# Altium PCB OpenRex_V1I1_PCB.PcbDoc (part 5 of 12)
Units mm, origin at the board's own origin, x right, y up, seen from the top; angles counter-clockwise.
Board outline 70 x 95 mm, 10 copper layers (L1, L2, L3, L4 (PWR), L5 (PWR), L6 (PWR), L7 (PWR), L8, L9, L10), stack 1.632 mm thick; 1080 components, 708 nets, 3831 pads, 2373 vias.
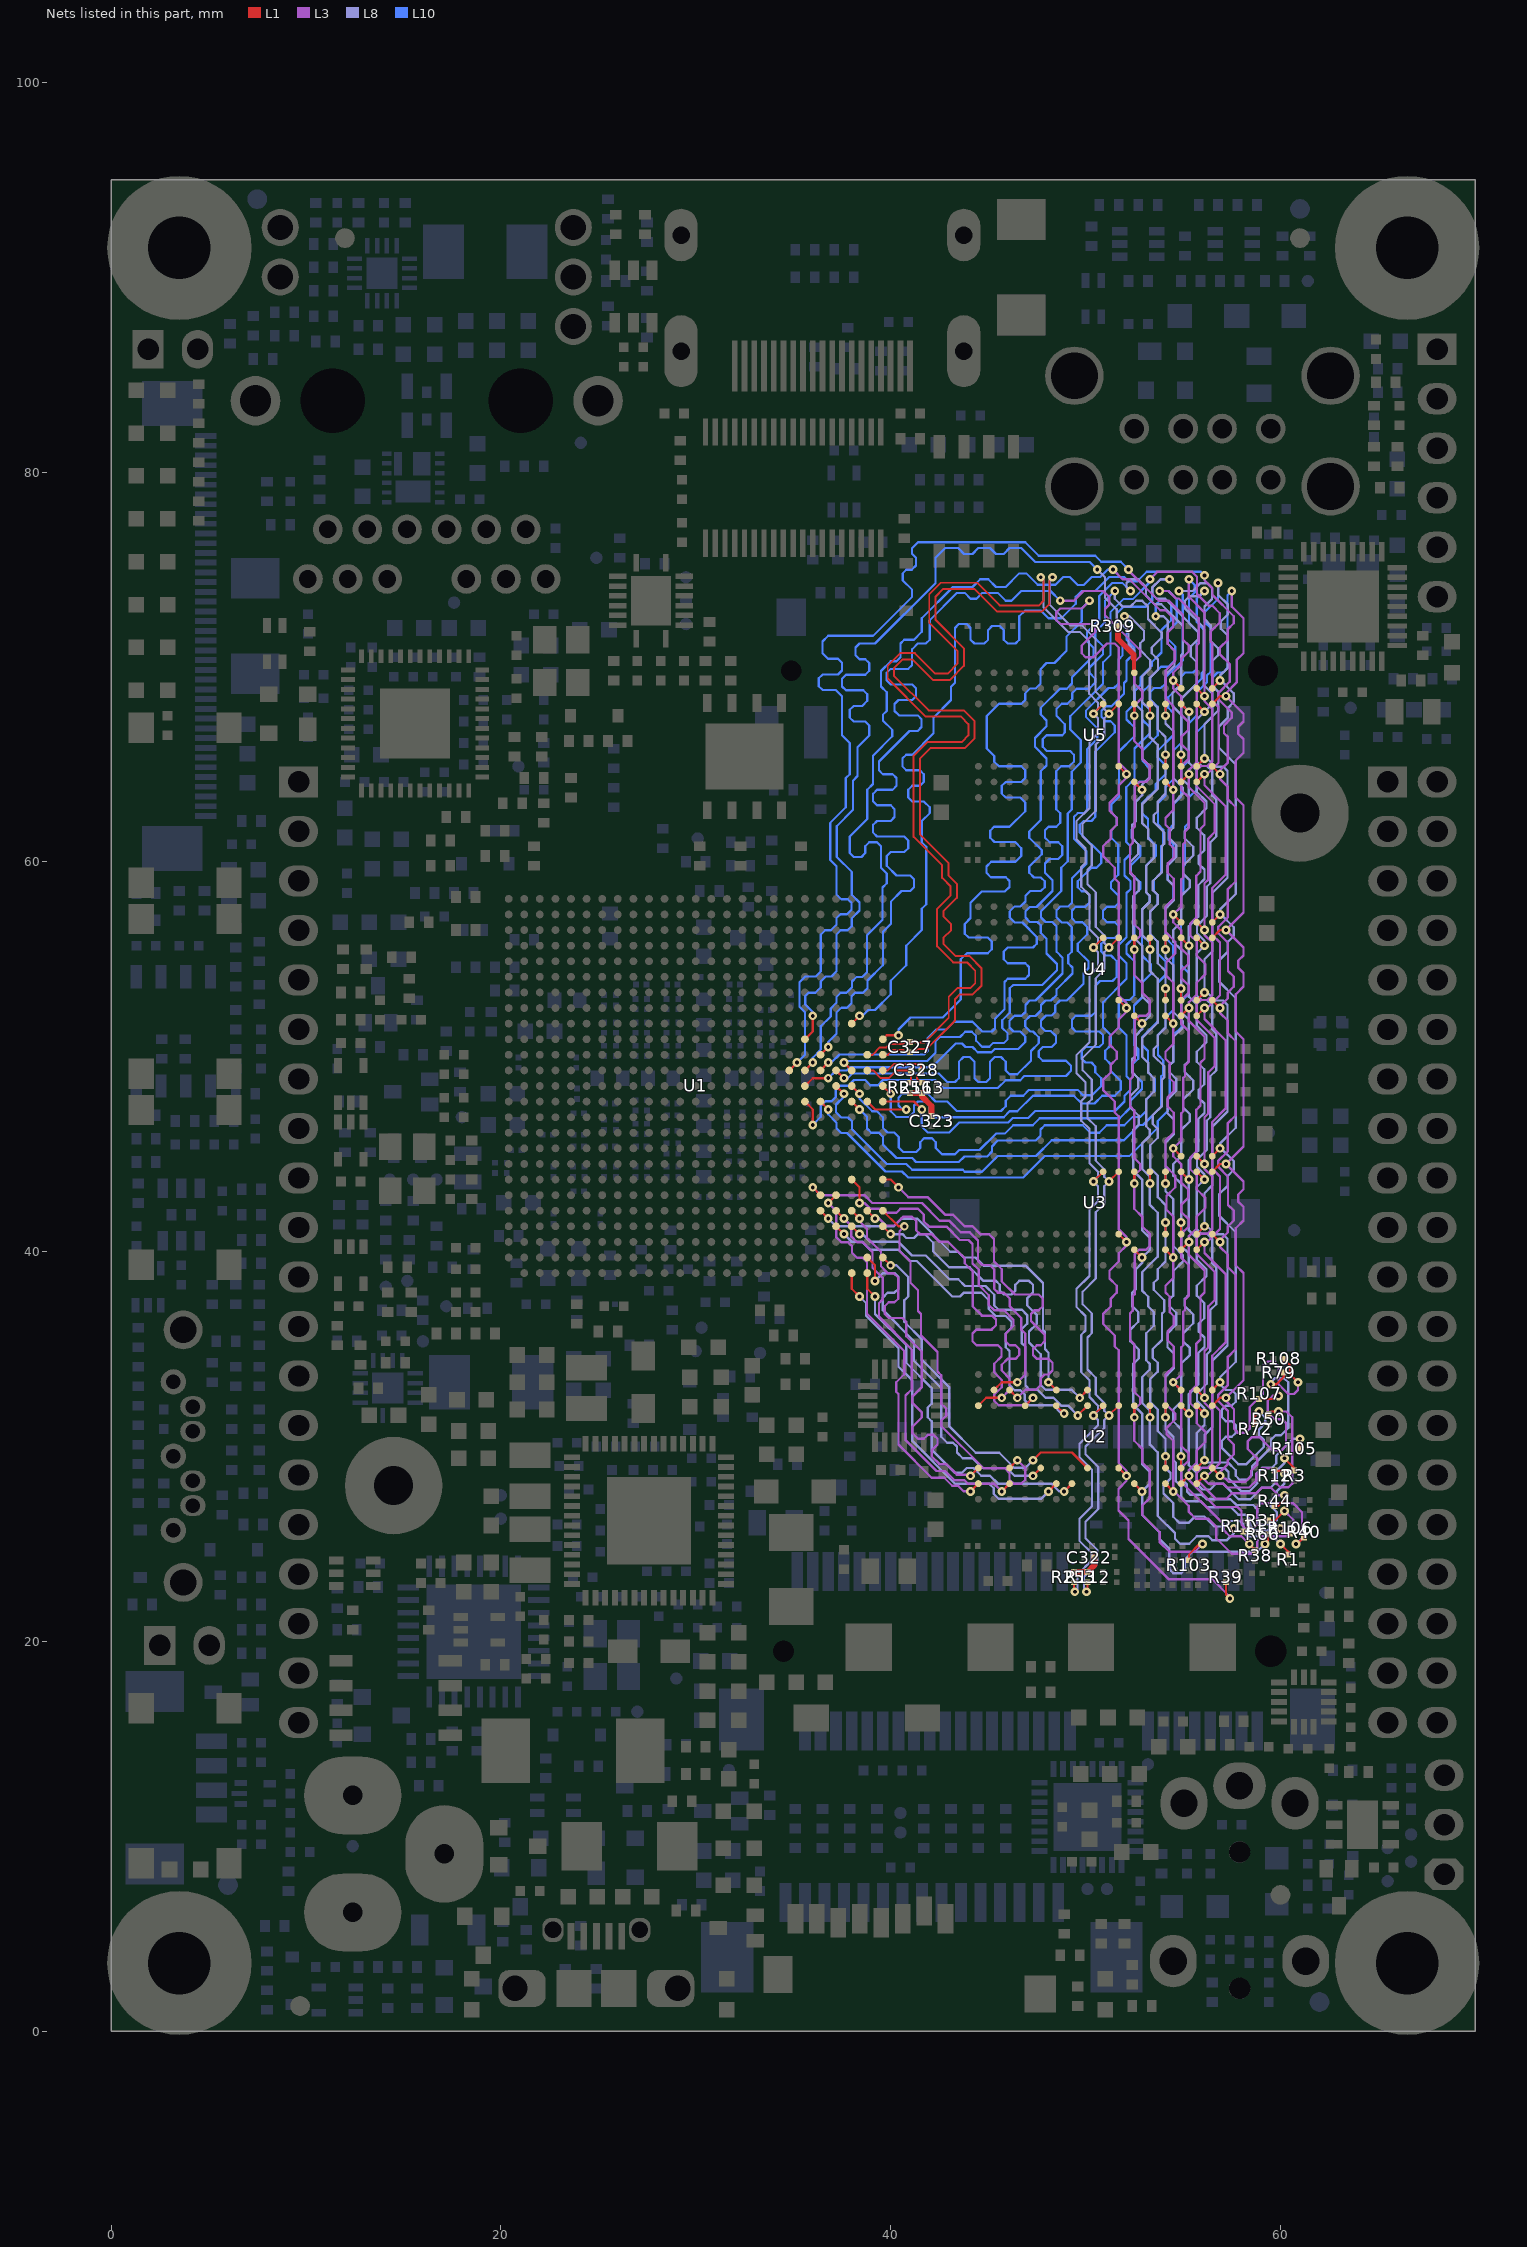
[diagram p13: the nets of this part, all layers, seen from the top]

## Via types
v1: diameter 0.45, hole 0.2, L1 to L10, tented both sides, 2369 vias
v2: diameter 1, hole 0.5, L1 to L10, tented top, 4 vias

## Nets (pads, with @x,y where several pads share a name; then routed paths per layer and width w, separated by ;. In a path a pad name is that pad's centre, name@x,y a point inside that pad or via, vN(x,y) a via of type N, cw(c..) or ccw(c..) an arc to the next point about the centre after c; other vN are vias at no path point) (continued)
DRAM3_ZQ1: R309.2 U5.L9 | length 2.7
  L1 w0.19: 52.48,70.44 52.48,69.72 U5.L9@52.5,69.7
  L1 w0.3: R309.2@51.665,72.1 51.665,71.435 52.46,70.64 52.46,70.46
DRAM_A0: R1.1 U1.AC14 U2.N3 U3.N3 U4.N3 U5.N3 | length 109.6
  L1 w0.114: v1(37.6,49.7) U1.AC14@38,49.3 ; U2.N3@54.1,28.9 v1(54.1,29.5) ; U3.N3@54.1,40.9 v1(54.1,41.5) ; U4.N3@54.1,52.9 v1(54.1,53.5) ; U5.N3@54.1,64.9 v1(54.1,65.5) ; v1(60,25) 60.4,24.6 R1.1@60.4,24.465
  L8 w0.12: v1(51.5,73.9) 51.5,73.5 51.9,73.1 52.3,73.1 52.6,73.4 52.9,73.4 53.2,73.1 53.2,72.456 53.9,71.756 53.9,71.5 53.4,71 53.4,70.7 53.715,70.385 53.715,69.859 53.3,69.444 53.3,68.3 53.7,67.9 53.7,66.8 54.1,66.4 v1(54.1,65.5) 54.1,63.5 53.7,63.1 53.7,62.6 53.5,62.4 53.5,62.044 54.035,61.509 54.035,60.935 53.92,60.82 53.92,59.476 53.45,59.006 53.45,58.55 53.7,58.3 53.7,57.844 53.315,57.459 53.315,56.29 53.7,55.905 53.7,54.8 54.1,54.4 v1(54.1,53.5) 54.1,51.5 53.7,51.1 53.7,50.6 53.5,50.4 53.5,50.044 54.035,49.509 54.035,48.935 53.92,48.82 53.92,47.476 53.45,47.006 53.45,46.55 53.7,46.3 53.7,45.844 53.315,45.459 53.315,44.29 53.7,43.905 53.7,42.8 54.1,42.4 v1(54.1,41.5) 54.1,39.5 53.7,39.1 53.7,38.6 53.5,38.4 53.5,38.044 54.035,37.509 54.035,36.935 53.92,36.82 53.92,35.476 53.45,35.006 53.45,34.55 53.7,34.3 53.7,33.844 53.315,33.459 53.315,32.29 53.7,31.905 53.7,30.8 54.1,30.4 v1(54.1,29.5) 54.1,28.9 54.355,28.645 54.355,28.355 54,28 54,27.6 54.5,27.1 54.5,26.4 54.8,26.1 55.3,26.1 55.615,26.415 56.085,26.415 56.6,25.9 57.144,25.9 57.429,26.185 57.915,26.185 58.1,26 58.1,25.6 58.315,25.385 59.615,25.385 v1(60,25)
  L10 w0.114: v1(37.6,49.7) 37.689,49.789 41.889,49.789 42.3,50.2 42.3,50.8 42.515,51.015 43.559,51.015 43.829,51.285 44.159,51.285 44.385,51.059 44.385,50.815 44.685,50.515 45.059,50.515 45.244,50.7 45.8,50.7 46,50.9 46,51.2 45.728,51.472 45.728,51.868 46.115,52.255 46.115,53.515 46.285,53.685 47.779,53.685 48.535,54.441 48.535,54.759 48,55.294 48,56.055 47.7,56.355 47.7,56.751 47.536,56.915 47.141,56.915 46.915,57.141 46.915,57.459 47.141,57.685 47.485,57.685 48.3,58.5 48.3,59.056 47.915,59.441 47.915,59.915 48.15,60.15 48.6,60.15 48.8,60.35 48.8,60.8 48.6,61 48.156,61 47.915,61.241 47.915,61.615 48.1,61.8 48.5,61.8 48.7,62 48.7,62.5 48.5,62.7 48.5,64.644 48.756,64.9 49.16,64.9 49.4,65.14 49.4,65.5 49.215,65.685 48.015,65.685 47.8,65.9 47.8,66.3 48,66.5 48.8,66.5 48.935,66.635 48.935,67.065 48.515,67.485 48.515,67.859 48.77,68.115 49.059,68.115 49.315,68.371 49.315,68.659 49.541,68.885 50.185,68.885 50.5,69.2 50.5,69.4 50.2,69.7 50.2,69.969 50.9,70.669 50.9,71.056 50.5,71.456 50.5,71.8 51,72.3 51,73.4 v1(51.5,73.9)
DRAM_A1: R3.1 U1.AB14 U2.P7 U3.P7 U4.P7 U5.P7 | length 109.5
  L1 w0.114: U1.AB14@37.2,49.3 v1(37.6,48.9) ; U2.P7@54.9,32.1 v1(55.3,31.7) ; U3.P7@54.9,44.1 v1(55.3,43.7) ; U4.P7@54.9,56.1 v1(55.3,55.7) ; U5.P7@54.9,68.1 v1(55.3,67.7) ; v1(60.2,29.4) 60.7,28.9 R3.1@60.7,28.765
  L8 w0.12: v1(54.3,74.5) 53.844,74.5 53.415,74.071 53.415,73.741 53.656,73.5 54.08,73.5 55.785,71.795 55.785,71.441 55.4,71.056 55.4,70.544 55.7,70.244 55.7,69.156 54.944,68.4 54.944,68.056 v1(55.3,67.7) 55.3,65.082 55.7,64.682 55.7,63.6 56.2,63.1 56.2,62.756 55.7,62.256 55.7,61.744 56.085,61.359 56.085,60.585 55.81,60.31 55.81,59.89 56.1,59.6 56.1,59.115 55.785,58.8 55.785,57.181 55.3,56.696 v1(55.3,55.7) 55.3,53.082 55.7,52.682 55.7,51.6 56.2,51.1 56.2,50.756 55.7,50.256 55.7,49.744 56.085,49.359 56.085,48.585 55.81,48.31 55.81,47.89 56.1,47.6 56.1,47.115 55.785,46.8 55.785,45.181 55.3,44.696 v1(55.3,43.7) 55.3,41.082 55.7,40.682 55.7,39.6 56.2,39.1 56.2,38.756 55.7,38.256 55.7,37.744 56.085,37.359 56.085,36.585 55.81,36.31 55.81,35.89 56.1,35.6 56.1,35.115 55.785,34.8 55.785,33.181 55.3,32.696 v1(55.3,31.7) 55.3,29.044 55.7,28.644 55.7,28.1 56,27.8 56.4,27.8 56.7,28.1 57.044,28.1 57.844,27.3 58.456,27.3 59.056,27.9 59.5,27.9 59.815,28.215 59.815,28.775 60.2,29.16 v1(60.2,29.4)
  L10 w0.114: v1(37.6,48.9) 37.796,48.9 38.033,49.137 42.463,49.137 42.9,48.7 43.3,48.7 43.5,48.9 43.5,49.744 43.741,49.985 44.059,49.985 44.3,49.744 44.3,48.9 44.5,48.7 44.9,48.7 45.1,48.9 45.1,49.744 45.341,49.985 45.659,49.985 45.9,49.744 45.9,49.3 46.1,49.1 46.5,49.1 47.2,49.8 47.2,50.3 47.6,50.7 47.6,51 47.3,51.3 47.156,51.3 46.9,51.556 46.9,51.844 47.146,52.091 47.435,52.091 47.715,52.371 47.715,52.659 47.941,52.885 48.229,52.885 48.515,53.171 48.515,53.459 49.33,54.274 49.33,54.585 49.115,54.8 49.115,55.215 49.285,55.385 49.285,56.659 49.059,56.885 48.771,56.885 48.515,57.141 48.515,57.515 48.715,57.715 49.115,57.715 49.3,57.9 49.3,59.156 50.05,59.906 50.05,60.55 49.4,61.2 49.4,62.3 49.6,62.5 49.9,62.5 50.085,62.685 50.085,65.785 50.6,66.3 50.6,66.856 50.015,67.441 50.015,67.759 51.171,68.915 51.459,68.915 51.685,69.141 51.685,70.385 51.9,70.6 51.9,71.2 51.615,71.485 51.615,72.759 51.941,73.085 53.085,73.085 53.415,73.415 53.415,74.059 53.856,74.5 v1(54.3,74.5)
DRAM_A2: R12.1 U1.AA14 U2.P3 U3.P3 U4.P3 U5.P3 | length 109.6
  L1 w0.114: U1.AA14@36.4,49.3 v1(36.8,49.7) ; U2.P3@54.9,28.9 v1(54.9,29.5) ; U3.P3@54.9,40.9 v1(54.9,41.5) ; U4.P3@54.9,52.9 v1(54.9,53.5) ; U5.P3@54.9,64.9 v1(54.9,65.5) ; R12.1@59.7,28.765 60.035,28.765 v1(60.2,28.6)
  L8 w0.12: v1(52.3,73.9) 52.1,74.1 52.1,74.3 52.3,74.5 52.7,74.5 53.1,74.1 53.1,73.66 53.54,73.22 53.88,73.22 55,72.1 55,70.7 54.9,70.6 54.9,69.1 54.456,68.656 54.456,68 54.9,67.556 v1(54.9,65.5) 54.9,64.3 55.3,63.9 55.3,61.8 55.085,61.585 55.085,61.215 55.525,60.775 55.525,60.325 55,59.8 55,59.4 55.35,59.05 55.35,58.694 54.9,58.244 54.9,56.9 54.5,56.5 54.5,55.9 54.9,55.5 v1(54.9,53.5) 54.9,52.3 55.3,51.9 55.3,49.8 55.085,49.585 55.085,49.215 55.525,48.775 55.525,48.325 55,47.8 55,47.4 55.35,47.05 55.35,46.694 54.9,46.244 54.9,44.9 54.5,44.5 54.5,43.9 54.9,43.5 v1(54.9,41.5) 54.9,40.3 55.3,39.9 55.3,37.8 55.085,37.585 55.085,37.215 55.525,36.775 55.525,36.325 55,35.8 55,35.4 55.35,35.05 55.35,34.694 54.9,34.244 54.9,32.3 54.5,31.9 54.5,31.3 54.9,30.9 v1(54.9,29.5) 54.915,29.485 54.915,28.341 55.2,28.055 55.2,27.7 55.38,27.52 55.98,27.52 56.2,27.3 57.436,27.3 57.736,27 58.6,27 58.8,26.8 58.8,26.2 59,26 59.6,26 59.815,26.215 59.815,26.629 59.5,26.944 59.5,27.256 59.8,27.556 59.8,27.7 60.2,28.1 v1(60.2,28.6)
  L10 w0.114: v1(36.8,49.7) 36.955,49.7 37.37,50.115 41.715,50.115 41.9,50.3 41.9,50.967 42.325,51.392 42.847,51.392 43.256,51.8 44.2,51.8 44.7,51.3 45.2,51.3 45.348,51.448 45.348,51.948 45.835,52.435 45.835,53.835 46,54 46.9,54 47.1,54.2 47.1,54.6 46.9,54.8 46,54.8 45.8,55 45.8,55.4 46,55.6 47.3,55.6 47.5,55.8 47.5,56.144 46.759,56.885 46.37,56.885 46.115,57.141 46.115,57.459 46.371,57.715 46.659,57.715 46.915,57.971 46.915,58.259 47.156,58.5 47.7,58.5 47.9,58.7 47.9,59 47.7,59.2 47.356,59.2 47.115,59.441 47.115,59.759 47.75,60.394 47.75,60.606 47.115,61.241 47.115,61.559 47.7,62.144 47.7,64.644 48,64.944 48,65.3 47.4,65.9 47.4,66.356 48,66.956 48,67.256 47.7,67.556 47.7,67.9 48.685,68.885 49.029,68.885 49.3,69.156 49.3,69.465 50.4,70.565 50.4,71 50.075,71.325 50.075,71.785 50.7,72.41 50.7,73.644 51.356,74.3 51.9,74.3 v1(52.3,73.9)
DRAM_A3: R31.1 U1.Y14 U2.N2 U3.N2 U4.N2 U5.N2 | length 109.5
  L1 w0.114: U1.Y14@35.6,49.3 v1(36,49.7) ; U2.N2@54.1,28.1 v1(54.5,27.7) ; U3.N2@54.1,40.1 v1(54.5,39.7) ; U4.N2@54.1,52.1 v1(54.5,51.7) ; U5.N2@54.1,64.1 v1(54.5,63.7) ; R31.1@59.365,26.2 59.7,26.2 v1(60.2,26.7)
  L3 w0.12: v1(51.4,75) 51.9,74.5 52.244,74.5 53.834,72.91 54.09,72.91 54.5,72.5 54.5,72.044 54.215,71.759 54.215,71.185 54.58,70.82 54.58,70.28 54.115,69.815 54.115,68.385 54.5,68 v1(54.5,63.7) 54.5,62.656 54.1,62.256 54.1,61.9 54.315,61.685 54.315,60.9 54.525,60.69 54.525,60.238 54.215,59.928 54.215,59.441 54.525,59.131 54.525,58.125 54.1,57.7 54.1,56.4 54.6,55.9 54.6,55.3 54.15,54.85 54.15,54.15 54.5,53.8 v1(54.5,51.7) 54.5,50.656 54.1,50.256 54.1,49.9 54.315,49.685 54.315,48.9 54.525,48.69 54.525,48.238 54.215,47.928 54.215,47.441 54.525,47.131 54.525,46.125 54.1,45.7 54.1,44.4 54.6,43.9 54.6,43.3 54.15,42.85 54.15,42.15 54.5,41.8 v1(54.5,39.7) 54.5,38.656 54.1,38.256 54.1,37.9 54.315,37.685 54.315,36.9 54.525,36.69 54.525,36.238 54.215,35.928 54.215,35.441 54.525,35.131 54.525,34.125 54.1,33.7 54.1,32.2 54.6,31.7 54.6,31.4 54.15,30.95 54.15,30.65 54.5,30.3 v1(54.5,27.7) 54.544,27.7 55.285,26.959 55.285,26.671 55.656,26.3 56.3,26.3 56.7,25.9 56.7,25.3 57.5,24.5 58.556,24.5 58.8,24.744 58.8,25.144 59.056,25.4 60.45,25.4 60.65,25.6 60.65,26.25 v1(60.2,26.7)
  L10 w0.114: v1(36,49.7) 36,49.956 36.415,50.371 36.415,51.56 36.925,52.07 36.925,52.481 37.215,52.771 37.215,53.059 37.441,53.285 37.729,53.285 38.015,53.571 38.015,53.859 38.241,54.085 38.529,54.085 38.785,54.341 38.785,56.229 39.585,57.029 39.585,58.685 39.8,58.9 39.8,59.404 39.5,59.704 39.5,60.8 39.3,61 38.9,61 38.7,60.8 38.7,60.45 38.5,60.25 38.1,60.25 37.9,60.45 37.9,61.3 38.8,62.2 38.8,63.7 39.09,63.99 39.09,65.446 40.085,66.441 40.085,66.771 39.6,67.256 39.6,67.544 39.8,67.744 39.8,68.7 39.5,69 39.5,69.796 40,70.296 40.296,70.296 40.5,70.5 40.5,71.2 40.7,71.4 41.2,71.4 41.6,71.8 41.6,72.5 43.2,74.1 44.2,74.1 44.6,74.5 45.004,74.5 45.404,74.1 45.9,74.1 46.6,74.8 46.956,74.8 47.541,74.215 48.459,74.215 48.859,74.615 49.185,74.615 49.6,74.2 49.9,74.2 50.315,74.615 50.759,74.615 51.144,75 v1(51.4,75)
DRAM_A4: R38.1 U1.W14 U2.P8 U3.P8 U4.P8 U5.P8 | length 109.4
  L1 w0.114: U1.W14@34.8,49.3 v1(35.2,49.7) ; v1(54.5,33.3) U2.P8@54.9,32.9 ; v1(54.5,45.3) U3.P8@54.9,44.9 ; v1(54.5,57.3) U4.P8@54.9,56.9 ; v1@54.5,69.3 U5.P8@54.9,68.9 ; v1(58.4,25) 58.7,24.7 R38.1@58.7,24.665
  L3 w0.12: v1(52.2,75) 52.2,74.955 53.755,73.4 54.28,73.4 55,72.68 55,71.4 55.3,71.1 55.3,70.8 54.9,70.4 54.9,70.1 54.5,69.7 v1(54.5,69.3) 54.5,68.9 54.9,68.5 54.9,67.556 55.275,67.181 55.275,66.775 54.9,66.4 54.9,66.044 55.3,65.644 55.3,65.3 54.9,64.9 54.9,63.7 55.3,63.3 55.3,61.744 55.1,61.544 55.1,61 55.015,60.915 55.015,59.2 54.915,59.1 54.915,57.715 v1(54.5,57.3) 54.5,56.9 54.9,56.5 54.9,55.556 55.275,55.181 55.275,54.775 54.9,54.4 54.9,54.044 55.3,53.644 55.3,53.3 54.9,52.9 54.9,51.7 55.3,51.3 55.3,49.744 55.1,49.544 55.1,49 55.015,48.915 55.015,47.2 54.915,47.1 54.915,45.715 v1(54.5,45.3) 54.5,44.9 54.9,44.5 54.9,43.556 55.275,43.181 55.275,42.775 54.9,42.4 54.9,42.044 55.3,41.644 55.3,41.3 54.9,40.9 54.9,39.7 55.3,39.3 55.3,37.744 55.1,37.544 55.1,37 55.015,36.915 55.015,35.2 54.915,35.1 54.915,33.715 v1(54.5,33.3) 54.9,32.9 54.9,30.044 55.3,29.644 55.3,29.3 54.9,28.9 54.9,28.2 57.1,26 57.1,25.7 57.4,25.4 58,25.4 v1(58.4,25)
  L10 w0.114: v1(35.2,49.7) 35.6,50.1 35.6,52.29 35.325,52.565 35.325,53.825 35.615,54.115 36.159,54.115 36.415,54.371 36.415,56.259 36.641,56.485 36.929,56.485 37.215,56.771 37.215,57.1 37.43,57.315 37.759,57.315 37.985,57.541 37.985,57.9 37.8,58.085 37.471,58.085 37.215,58.341 37.215,59.785 36.9,60.1 36.9,62 37.7,62.8 37.7,64.3 37.9,64.5 37.9,66.1 37.5,66.5 37.5,68.5 37.185,68.815 36.515,68.815 36.315,69.015 36.315,69.415 36.515,69.615 37.3,69.615 37.5,69.815 37.5,70.215 37.3,70.415 36.785,70.415 36.5,70.7 36.5,71.3 36.8,71.6 39.1,71.6 41.1,73.6 41.1,73.956 40.615,74.441 40.615,74.8 40.8,74.985 41.085,74.985 41.3,75.2 41.3,75.6 41.1,75.8 41.1,76.1 41.4,76.4 46.9,76.4 47.6,75.7 50.5,75.7 50.8,75.4 51.8,75.4 v1(52.2,75)
DRAM_A5: R40.1 U1.AE13 U2.P2 U3.P2 U4.P2 U5.P2 | length 109.4
  L1 w0.114: U1.AE13@39.6,48.5 v1(40,48.1) ; U2.P2@54.9,28.1 v1(55.3,28.5) ; U3.P2@54.9,40.1 v1(55.3,40.5) ; U4.P2@54.9,52.1 v1(55.3,52.5) ; U5.P2@54.9,64.1 v1(55.3,64.5) ; v1(60.8,25) 60.865,25 R40.1@61.2,25.335
  L3 w0.12: v1(53.8,73.9) 54.256,73.9 54.641,73.515 54.785,73.515 55.8,72.5 55.8,71.2 55.7,71.1 55.7,65.118 55.3,64.718 v1(55.3,64.5) 55.3,63.829 56.1,63.029 56.1,61.9 55.9,61.7 55.9,59.5 55.685,59.285 55.685,57.141 55.375,56.831 55.375,56.225 55.7,55.9 55.7,55.2 56.15,54.75 56.15,54.25 55.7,53.8 55.7,53.2 55.3,52.8 v1(55.3,52.5) 55.3,51.829 56.1,51.029 56.1,49.9 55.9,49.7 55.9,47.5 55.685,47.285 55.685,45.141 55.375,44.831 55.375,44.225 55.7,43.9 55.7,43.2 56.15,42.75 56.15,42.25 55.7,41.8 55.7,41.2 55.3,40.8 v1(55.3,40.5) 55.3,39.829 56.1,39.029 56.1,37.9 55.9,37.7 55.9,35.5 55.685,35.285 55.685,33.141 55.375,32.831 55.375,32.225 55.7,31.9 55.7,31.2 56.15,30.75 56.15,30.25 55.7,29.8 55.7,29.2 55.3,28.8 v1(55.3,28.5) 55.3,28.282 56.682,26.9 57.8,26.9 58,26.7 58,26 58.2,25.8 58.6,25.8 58.8,26 58.8,26.9 59,27.1 60.635,27.1 61.1,26.635 61.1,25.3 v1(60.8,25)
  L10 w0.114: v1(40,48.1) 40,47.2 40.285,46.915 40.959,46.915 41.2,47.156 41.2,47.5 41.4,47.7 41.8,47.7 42,47.5 42,47.1 42.2,46.9 45.8,46.9 46.1,47.2 46.5,47.2 47.3,48 49.4,48 49.8,47.6 50.456,47.6 50.856,48 51.5,48 51.8,48.3 51.8,48.756 51.3,49.256 51.3,49.6 51.006,49.894 51.006,50.306 51.3,50.6 51.3,51.1 50.9,51.5 50.9,52.8 52.1,54 52.1,54.8 51.7,55.2 51.7,55.735 52.1,56.135 52.1,58.4 52.3,58.6 52.3,59 52,59.3 52,60.1 52.3,60.4 52.3,60.8 52.085,61.015 52.085,63.825 52.515,64.255 52.515,65.815 53.3,66.6 53.3,66.9 52.9,67.3 52.9,68.7 53.315,69.115 53.315,69.459 53.871,70.015 54.259,70.015 54.6,70.356 54.6,71.056 54.215,71.441 54.215,71.815 54.68,72.28 54.68,73.476 54.256,73.9 v1(53.8,73.9)
DRAM_A6: R44.1 U1.AC13 U2.R8 U3.R8 U4.R8 U5.R8 | length 109.4
  L1 w0.114: U1.AC13@38,48.5 v1(38.4,48.1) ; U2.R8@55.7,32.9 v1(56.1,32.5) ; U3.R8@55.7,44.9 v1(56.1,44.5) ; U4.R8@55.7,56.9 v1(56.1,56.5) ; U5.R8@55.7,68.9 v1(56.1,68.5) ; R44.1@59.7,26.935 59.869,26.935 60.2,27.266 v1(60.2,27.5)
  L3 w0.12: v1(55.3,74.5) 55.3,73.6 56.1,72.8 v1(56.1,68.5) 56.1,68.244 56.5,67.844 56.5,65.156 56.259,64.915 55.915,64.915 55.7,64.7 55.7,63.882 56.625,62.957 56.625,61.525 56.3,61.2 56.3,59.1 56.1,58.9 v1(56.1,56.5) 56.1,56.244 56.5,55.844 56.5,53.156 56.259,52.915 55.915,52.915 55.7,52.7 55.7,51.882 56.625,50.957 56.625,49.525 56.3,49.2 56.3,47.1 56.1,46.9 v1(56.1,44.5) 56.1,44.244 56.5,43.844 56.5,41.156 56.259,40.915 55.915,40.915 55.7,40.7 55.7,39.882 56.625,38.957 56.625,37.525 56.3,37.2 56.3,35.1 56.1,34.9 v1(56.1,32.5) 56.1,32.244 56.5,31.844 56.5,29.156 56.259,28.915 55.971,28.915 55.7,28.644 55.7,28.304 56.689,27.315 57.215,27.315 57.5,27.6 58.756,27.6 59.041,27.885 59.515,27.885 59.9,27.5 v1(60.2,27.5)
  L10 w0.114: v1(38.4,48.1) 38.4,47.85 39.05,47.2 39.3,47.2 39.6,46.9 39.6,46.356 39.841,46.115 40.185,46.115 40.415,45.885 40.415,45.341 40.641,45.115 41.315,45.115 41.515,45.315 41.515,45.615 41.715,45.815 42.115,45.815 42.315,45.615 42.315,45.315 42.63,45 43.3,45 43.515,45.215 44.559,45.215 45.4,46.056 45.856,46.056 46.285,46.485 47.285,46.485 47.65,46.85 51.75,46.85 52.3,47.4 52.3,47.744 52.9,48.344 52.9,48.7 52.415,49.185 52.415,49.615 52.7,49.9 52.7,50.4 52.485,50.615 52.485,52.629 52.9,53.044 52.9,53.8 53.35,54.25 53.35,54.75 52.9,55.2 52.9,57.556 53.285,57.941 53.285,58.259 53.1,58.444 53.1,59.8 53.6,60.3 53.6,60.856 53.2,61.256 53.2,62.2 52.9,62.5 52.9,63 53.6,63.7 53.6,64 54.1,64.5 54.1,64.956 53.7,65.356 53.7,65.7 54.485,66.485 54.485,67.659 54.244,67.9 54.244,68.444 54.9,69.1 54.9,69.5 55.115,69.715 55.515,69.715 55.685,69.885 55.685,71.285 55.8,71.4 55.8,71.744 55.3,72.244 55.3,73.52 55.6,73.82 55.6,74.2 v1(55.3,74.5)
DRAM_A7: R50.1 U1.Y13 U2.R2 U3.R2 U4.R2 U5.R2 | length 109.5
  L1 w0.114: U1.Y13@35.6,48.5 36,48.9 v1(36.8,48.9) ; U2.R2@55.7,28.1 v1(56.1,28.5) ; U3.R2@55.7,40.1 v1(56.1,40.5) ; U4.R2@55.7,52.1 v1(56.1,52.5) ; U5.R2@55.7,64.1 v1(56.1,64.5) ; R50.1@59.4,31.665 59.535,31.8 v1(59.9,31.8)
  L3 w0.12: v1(53.3,74.5) 53.685,74.885 55.459,74.885 55.715,74.629 55.715,73.741 56.1,73.356 56.318,73.137 56.507,73.137 56.885,72.759 56.885,72.285 56.415,71.815 56.415,71.3 56.5,71.215 56.5,68.26 56.82,67.94 56.82,65.08 56.24,64.5 v1(56.1,64.5) 56.1,63.934 57.185,62.849 57.185,59.341 56.5,58.656 56.5,56.26 56.9,55.86 56.9,53.16 56.24,52.5 v1(56.1,52.5) 56.1,51.934 57.185,50.849 57.185,47.341 56.5,46.656 56.5,44.26 56.9,43.86 56.9,41.16 56.24,40.5 v1(56.1,40.5) 56.1,39.934 57.185,38.849 57.185,35.341 56.5,34.656 56.5,32.24 56.9,31.84 56.9,29.16 56.24,28.5 v1(56.1,28.5) 56.1,28.3 56.315,28.085 57.059,28.085 57.244,27.9 58.4,27.9 58.765,28.265 58.765,28.61 59.041,28.885 59.515,28.885 59.74,28.66 59.74,28.16 59.985,27.915 60.415,27.915 60.6,28.1 60.6,31.5 60.3,31.8 v1(59.9,31.8)
  L10 w0.114: v1(36.8,48.9) 37.2,49.3 37.744,49.3 37.907,49.463 42.119,49.463 43.341,50.685 43.659,50.685 43.844,50.5 44.2,50.5 44.465,50.235 45.175,50.235 45.34,50.4 46.544,50.4 46.9,50.756 46.9,51.044 46.644,51.3 46.3,51.3 46.1,51.5 46.1,51.844 46.356,52.1 46.715,52.1 46.915,52.3 46.915,52.659 47.141,52.885 47.429,52.885 48.815,54.271 48.815,55.085 48.515,55.385 48.515,56.685 48.285,56.915 47.941,56.915 47.715,57.141 47.715,57.459 48.756,58.5 48.756,59.7 49.08,60.024 49.08,62.484 49.285,62.689 49.285,64.629 49.75,65.094 49.75,66.25 49.215,66.785 49.215,67.471 50.9,69.156 50.9,70.244 51.285,70.629 51.285,72.825 51.94,73.48 52.424,73.48 53.3,74.356 v1(53.3,74.5)
DRAM_A8: R72.1 U1.AB13 U2.T8 U3.T8 U4.T8 U5.T8 | length 109.5
  L1 w0.114: U1.AB13@37.2,48.5 v1(37.6,48.1) ; U2.T8@56.5,32.9 v1(56.9,33.3) ; U3.T8@56.5,44.9 v1(56.9,45.3) ; U4.T8@56.5,56.9 v1(56.9,57.3) ; U5.T8@56.5,68.9 v1@56.9,69.3 ; R72.1@58.7,31.165 58.7,31.6 v1(58.9,31.8)
  L8 w0.12: v1(56.8,74.3) 56.8,73.7 57.3,73.2 57.3,72.7 56.932,72.332 56.932,71.968 57.3,71.6 57.3,69.956 56.9,69.556 v1(56.9,69.3) 56.944,69.3 57.6,68.644 57.6,68.2 57.3,67.9 57.3,67.4 56.845,66.945 56.845,65.855 57.7,65 57.7,58.356 56.9,57.556 v1(56.9,57.3) 56.944,57.3 57.6,56.644 57.6,56.2 57.3,55.9 57.3,55.4 56.845,54.945 56.845,53.855 57.7,53 57.7,46.356 56.9,45.556 v1(56.9,45.3) 56.944,45.3 57.6,44.644 57.6,44.2 57.3,43.9 57.3,43.4 56.845,42.945 56.845,41.855 57.7,41 57.7,34.356 56.9,33.556 v1(56.9,33.3) 56.9,33.2 57.2,32.9 57.5,32.9 57.7,32.7 57.7,32.3 57.5,32.1 57.2,32.1 57,31.9 57,31.5 57.2,31.3 57.5,31.3 57.7,31.1 57.7,30.7 57.5,30.5 57.2,30.5 57,30.3 57,29.934 57.834,29.1 58.26,29.1 59.15,29.99 59.15,30.35 58.9,30.6 58.9,30.88 59.22,31.2 59.22,31.48 v1(58.9,31.8)
  L10 w0.114: v1(37.6,48.1) 37.6,47.945 37.2,47.545 37.2,47.156 37.471,46.885 37.815,46.885 38.015,46.685 38.015,46.285 39.8,44.5 40.8,44.5 41.1,44.2 43.7,44.2 43.8,44.1 44.69,44.1 45.5,44.91 47.454,44.91 48.259,45.715 51.971,45.715 52.756,46.5 52.944,46.5 53.885,47.441 53.885,49 53.985,49.1 53.985,49.815 53.715,50.085 53.715,51.115 54.1,51.5 54.1,52 54.5,52.4 54.5,55.7 54.1,56.1 54.1,57.7 54.5,58.1 54.5,58.8 54.215,59.085 54.215,59.815 54.5,60.1 54.5,60.9 54.265,61.135 54.265,61.665 54.515,61.915 54.515,62.959 54.9,63.344 54.9,64.8 55.3,65.2 55.3,67.1 55.715,67.515 55.715,68.695 56.235,69.215 56.235,69.575 56.415,69.755 56.415,71.995 56.1,72.31 56.1,72.8 56.8,73.5 v1(56.8,74.3)
DRAM_A9: R79.1 U1.AE12 U2.R3 U3.R3 U4.R3 U5.R3 | length 109.4
  L1 w0.114: U1.AE12@39.6,47.7 41.2,47.7 v1(41.6,47.3) ; U2.R3@55.7,28.9 v1(56.1,29.3) ; U3.R3@55.7,40.9 v1(56.1,41.3) ; U4.R3@55.7,52.9 v1(56.1,53.3) ; U5.R3@55.7,64.9 v1(56.1,65.3) ; v1(59.5,33.2) 59.8,33.2 60.165,33.565 R79.1@60.165,33.8
  L8 w0.12: v1(54.8,73.9) 55.5,73.9 55.9,74.3 56.244,74.3 56.485,74.059 56.485,73.485 56.1,73.1 56.1,72.456 56.415,72.141 56.415,71.341 56.8,70.956 56.8,70.6 56.515,70.315 56.515,69.025 56.8,68.74 56.8,67.756 56.1,67.056 v1(56.1,65.3) 56.24,65.3 56.655,64.885 57.059,64.885 57.285,64.659 57.285,59.185 56.515,58.415 56.515,55.415 56.1,55 v1(56.1,53.3) 56.24,53.3 56.655,52.885 57.059,52.885 57.285,52.659 57.285,47.185 56.515,46.415 56.515,43.415 56.1,43 v1(56.1,41.3) 56.24,41.3 56.655,40.885 57.059,40.885 57.285,40.659 57.285,35.185 56.515,34.415 56.515,31.015 56.1,30.6 v1(56.1,29.3) 56.22,29.18 57.302,29.18 57.7,28.782 57.7,28.5 57.9,28.3 58.3,28.3 58.535,28.535 58.535,28.979 59.515,29.959 59.515,30.359 59.741,30.585 60.029,30.585 60.4,30.956 60.4,33.3 60.2,33.5 59.7,33.5 59.5,33.3 v1(59.5,33.2)
  L10 w0.114: v1(41.6,47.3) 41.6,46.415 41.9,46.115 43,46.115 43.505,46.62 46.02,46.62 46.258,46.858 47.058,46.858 47.415,47.215 51.515,47.215 52,47.7 52,48 52.3,48.3 52.3,48.8 52.1,49 52.1,51.1 51.7,51.5 51.7,52.7 51.915,52.915 52.259,52.915 52.5,53.156 52.5,54.9 52.1,55.3 52.1,55.738 52.5,56.138 52.5,58.3 52.8,58.6 52.8,58.956 52.315,59.441 52.315,59.815 52.8,60.3 52.8,60.8 52.365,61.235 52.365,61.665 52.515,61.815 52.515,63.859 52.771,64.115 53.115,64.115 53.285,64.285 53.285,64.815 52.915,65.185 52.915,65.715 53.7,66.5 53.7,67.956 53.315,68.341 53.315,68.705 53.525,68.915 53.859,68.915 54.085,69.141 54.085,69.445 54.985,70.345 54.985,73.715 v1(54.8,73.9)
DRAM_A10: R103.1 U1.AA15 U2.L7 U3.L7 U4.L7 U5.L7 | length 109.5
  L1 w0.114: U1.AA15@36.4,50.1 v1(36.8,50.5) ; v1(52.5,31.5) U2.L7@52.5,32.1 ; v1(52.5,43.5) U3.L7@52.5,44.1 ; v1(52.5,55.5) U4.L7@52.5,56.1 ; v1(52.5,67.5) U5.L7@52.5,68.1 ; R103.1@55.3,24.165 55.3,24.45 55.85,25 v1(56,25)
  L3 w0.12: v1(48.7,73.4) 49.4,73.4 49.9,73.9 50.9,73.9 51.22,73.58 51.22,73.2 51,72.98 51,72.656 52.8,70.856 52.8,70.544 52.5,70.244 52.5,69.164 52.9,68.764 52.9,68.4 52.5,68 v1(52.5,67.5) 52.5,66.2 52.9,65.8 52.9,65.3 53.3,64.9 53.3,64.3 53.098,64.098 52.754,64.098 52.515,63.859 52.515,61.815 52.415,61.715 52.415,60.964 52.275,60.824 52.275,59.481 52.5,59.256 52.5,56.8 52.8,56.5 52.8,56.2 52.5,55.9 v1(52.5,55.5) 52.5,54.2 52.9,53.8 52.9,53.3 53.3,52.9 53.3,52.3 53.098,52.098 52.754,52.098 52.515,51.859 52.515,49.815 52.415,49.715 52.415,48.964 52.275,48.824 52.275,47.481 52.5,47.256 52.5,44.8 52.8,44.5 52.8,44.2 52.5,43.9 v1(52.5,43.5) 52.5,42.2 52.9,41.8 52.9,41.3 53.3,40.9 53.3,40.3 53.098,40.098 52.754,40.098 52.515,39.859 52.515,37.815 52.415,37.715 52.415,36.964 52.275,36.824 52.275,35.481 52.5,35.256 52.5,32.8 52.8,32.5 52.8,32.2 52.5,31.9 v1(52.5,31.5) 52.5,30.3 52.9,29.9 52.9,29.2 53.3,28.8 53.3,27.366 52.9,26.966 52.9,26.5 53.8,25.6 53.8,25.1 54.3,24.6 55.6,24.6 v1(56,25)
  L10 w0.114: v1(36.8,50.5) 36.8,50.756 37.215,51.171 37.215,52.259 37.471,52.515 37.759,52.515 37.985,52.741 37.985,53.1 38.17,53.285 38.585,53.285 38.815,53.515 38.815,53.915 39.6,54.7 39.6,56.4 40.01,56.81 40.01,57.956 40.554,58.5 41,58.5 41.2,58.7 41.2,59.1 41,59.3 40.3,59.3 39.8,59.8 39.8,60.3 40,60.5 40.7,60.5 40.9,60.7 40.9,61.1 40.7,61.3 39.3,61.3 39.1,61.5 39.1,61.9 39.3,62.1 40,62.1 40.2,62.3 40.2,62.7 40,62.9 39.3,62.9 39.1,63.1 39.1,63.5 39.3,63.7 40.1,63.7 40.3,63.9 40.3,64.3 40.1,64.5 39.6,64.5 39.4,64.7 39.4,65.15 40.965,66.715 41.385,66.715 41.585,66.915 41.585,67.315 41.385,67.515 40.8,67.515 40.429,67.515 40.2,67.744 40.2,68.1 40.4,68.3 41.1,68.3 41.3,68.5 41.3,68.9 41.1,69.1 40,69.1 39.8,69.3 39.8,69.7 40,69.9 40.9,69.9 41.1,70.1 41.1,70.904 41.396,71.2 41.8,71.2 42,71.4 42,72.4 43.4,73.8 43.8,73.8 44.1,73.5 44.4,73.5 44.7,73.8 45.5,73.8 45.9,73.4 46.2,73.4 46.7,73.9 48.2,73.9 v1(48.7,73.4)
DRAM_A11: R105.1 U1.AC12 U2.R7 U3.R7 U4.R7 U5.R7 | length 109.5
  L1 w0.114: U1.AC12@38,47.7 v1(38.4,47.3) ; U2.R7@55.7,32.1 v1(56.1,31.7) ; U3.R7@55.7,44.1 v1(56.1,43.7) ; U4.R7@55.7,56.1 v1(56.1,55.7) ; U5.R7@55.7,68.1 v1(56.1,67.7) ; R105.1@60.965,29.9 60.965,30.365 v1(61,30.4)
  L8 w0.12: v1(56.1,73.9) 55.82,73.62 55.32,73.62 55.1,73.4 55.1,73 56.065,72.035 56.065,69.079 56.485,68.659 56.485,68.085 v1(56.1,67.7) 55.7,67.3 55.7,65.156 55.941,64.915 56.229,64.915 56.5,64.644 56.5,63.4 56.7,63.2 56.7,61.3 56.4,61 56.4,58.9 56.22,58.72 56.22,57.22 55.715,56.715 55.715,56.341 56.1,55.956 v1(56.1,55.7) 55.7,55.3 55.7,53.156 55.941,52.915 56.229,52.915 56.5,52.644 56.5,51.4 56.7,51.2 56.7,49.3 56.4,49 56.4,46.9 56.22,46.72 56.22,45.22 55.715,44.715 55.715,44.341 56.1,43.956 v1(56.1,43.7) 55.7,43.3 55.7,41.156 55.941,40.915 56.229,40.915 56.5,40.644 56.5,39.4 56.7,39.2 56.7,37.3 56.4,37 56.4,34.9 56.22,34.72 56.22,33.22 55.715,32.715 55.715,32.341 56.1,31.956 v1(56.1,31.7) 56.1,31.1 55.7,30.7 55.7,29.1 55.9,28.9 57.129,28.9 57.329,28.7 57.329,28.371 58,27.7 58.4,27.7 58.815,28.115 58.815,28.66 59.07,28.915 59.559,28.915 59.785,29.141 59.785,29.541 60.644,30.4 v1(61,30.4)
  L10 w0.114: v1(38.4,47.3) 38.785,46.915 38.785,46.315 39,46.1 39.4,46.1 39.6,45.9 39.6,45.5 40.3,44.8 41.1,44.8 41.3,44.6 43.5,44.6 43.785,44.885 44.95,44.885 45.2,45.135 45.2,45.4 45.5,45.7 47.444,45.7 47.685,45.941 47.685,46.27 47.9,46.485 49.859,46.485 50.244,46.1 50.7,46.1 51.085,46.485 51.985,46.485 52.415,46.915 52.815,46.915 53.1,47.2 53.1,47.8 53.55,48.25 53.55,48.85 53.2,49.2 53.2,50.3 52.9,50.6 52.9,51 53.715,51.815 53.715,53.815 54.1,54.2 54.1,54.9 53.7,55.3 53.7,55.9 53.3,56.3 53.3,57.444 53.7,57.844 53.7,58.3 53.5,58.5 53.5,59.056 53.885,59.441 53.885,60.8 53.985,60.9 53.985,61.644 53.715,61.914 53.715,63.015 54.1,63.4 54.1,63.844 54.5,64.244 54.5,65.7 54.915,66.115 54.915,68.371 55.955,69.411 55.955,69.691 56.1,69.836 56.1,71.9 55.7,72.3 55.7,73.5 v1(56.1,73.9)
DRAM_A12: R106.1 U1.AD12 U2.N7 U3.N7 U4.N7 U5.N7 | length 109.6
  L1 w0.114: U1.AD12@38.8,47.7 39.2,47.3 v1(40.8,47.3) ; v1(54.1,31.5) U2.N7@54.1,32.1 ; v1(54.1,43.5) U3.N7@54.1,44.1 ; v1(54.1,55.5) U4.N7@54.1,56.1 ; v1(54.1,67.5) U5.N7@54.1,68.1 ; v1(60,25.8) 60.265,25.535 R106.1@60.5,25.535
  L8 w0.12: v1(53.6,72.6) 54,72.6 54.215,72.385 54.215,71.185 54.566,70.834 54.566,70.066 54.1,69.6 v1(54.1,67.5) 54.1,67.1 54.5,66.7 54.5,64.304 55,63.804 55,63.5 54.5,63 54.5,61.744 54.315,61.559 54.315,61.2 54.65,60.865 54.65,60.25 54.2,59.8 54.2,59.1 54.535,58.765 54.535,58.035 54.1,57.6 v1(54.1,55.5) 54.1,55.1 54.5,54.7 54.5,52.304 55,51.804 55,51.5 54.5,51 54.5,49.744 54.315,49.559 54.315,49.2 54.65,48.865 54.65,48.25 54.2,47.8 54.2,47.1 54.535,46.765 54.535,46.035 54.1,45.6 v1(54.1,43.5) 54.1,43.1 54.5,42.7 54.5,40.304 55,39.804 55,39.5 54.5,39 54.5,37.744 54.315,37.559 54.315,37.2 54.65,36.865 54.65,36.25 54.2,35.8 54.2,35.1 54.535,34.765 54.535,34.035 54.1,33.6 v1(54.1,31.5) 54.1,30.9 54.515,30.485 54.515,29.285 54.635,29.165 54.635,28.225 54.9,27.96 54.9,27.4 55.1,27.2 55.9,27.2 56.215,26.885 57.455,26.885 57.84,26.5 58.2,26.5 58.44,26.26 58.44,25.96 58.7,25.7 59.9,25.7 v1(60,25.8)
  L10 w0.114: v1(40.8,47.3) 40.6,47.3 40.4,47.5 40.4,47.9 40.6,48.1 41.9,48.1 42.3,47.7 42.9,47.7 43.385,47.215 45.659,47.215 45.9,47.456 45.9,47.744 46.156,48 46.8,48 47.1,48.3 49.6,48.3 49.87,48.03 50.33,48.03 50.8,48.5 50.8,48.9 50.5,49.2 50.5,49.5 50.3,49.7 50,49.7 49.8,49.9 49.8,50.3 50,50.5 50.7,50.5 50.9,50.7 50.9,51.1 50.7,51.3 49.5,51.3 49.3,51.5 49.3,51.9 49.5,52.1 50.3,52.1 50.515,52.315 50.515,53.659 50.741,53.885 51.385,53.885 51.6,54.1 51.6,54.904 51.304,55.2 51,55.2 50.8,55.4 50.8,55.8 51.1,56.1 51.5,56.1 51.7,56.3 51.7,56.7 51.5,56.9 51.1,56.9 50.9,57.1 50.9,57.5 51.1,57.7 51.5,57.7 51.7,57.9 51.7,58.244 51.3,58.644 51.3,58.96 51.68,59.34 51.68,60.876 51.315,61.241 51.315,61.615 51.6,61.9 51.6,62.256 51.315,62.541 51.315,62.944 51.715,63.344 51.715,65.659 52.5,66.444 52.5,66.9 52.1,67.3 52.1,67.7 52.534,68.134 52.534,68.78 52.822,69.068 52.822,69.478 53.4,70.056 53.4,70.244 53.9,70.744 53.9,71.9 54.4,72.4 54.4,73.2 54.2,73.4 53.8,73.4 53.6,73.2 v1(53.6,72.6)
DRAM_A13: R107.1 U1.AC17 U2.T3 U3.T3 U4.T3 U5.T3 | length 109.5
  L1 w0.114: U1.AC17@38,51.7 v1(38.4,52.1) ; U2.T3@56.5,28.9 v1(56.9,28.5) ; U3.T3@56.5,40.9 v1(56.9,40.5) ; U4.T3@56.5,52.9 v1(56.9,52.5) ; U5.T3@56.5,64.9 v1(56.9,64.5) ; R107.1@58.9,32.435 59.735,32.435 v1(59.9,32.6)
  L3 w0.12: v1(56.1,74.7) 56.1,74.444 56.515,74.029 56.515,73.685 57.6,72.6 57.6,72.244 57.3,71.944 57.3,71.4 56.9,71 56.9,70.644 57.4,70.144 57.4,69.246 56.815,68.661 56.815,68.341 57.5,67.656 57.5,67.4 57.1,67 57.1,66.6 57.3,66.4 57.3,65.1 56.9,64.7 v1(56.9,64.5) 56.9,64.244 57.3,63.844 57.3,63.2 57.7,62.8 57.7,59 57.3,58.6 57.3,57.156 56.815,56.671 56.815,56.341 57.31,55.846 57.31,54.4 57.6,54.11 57.6,53.6 57.3,53.3 57.3,53 56.9,52.6 v1(56.9,52.5) 56.9,52.244 57.3,51.844 57.3,51.2 57.7,50.8 57.7,47 57.3,46.6 57.3,45.156 56.815,44.671 56.815,44.341 57.31,43.846 57.31,42.4 57.6,42.11 57.6,41.6 57.3,41.3 57.3,41 56.9,40.6 v1(56.9,40.5) 56.9,40.244 57.3,39.844 57.3,39.2 57.7,38.8 57.7,35 57.3,34.6 57.3,33.156 56.815,32.671 56.815,32.321 57.31,31.826 57.31,30.4 57.6,30.11 57.6,29.6 57.3,29.3 57.3,29.1 56.9,28.7 v1(56.9,28.5) 56.971,28.5 57.106,28.365 57.175,28.365 57.34,28.2 58.2,28.2 58.485,28.485 58.485,28.755 58.8,29.07 58.8,29.4 58.315,29.885 58.315,30.259 58.541,30.485 58.915,30.485 59.6,29.8 60.044,29.8 60.285,30.041 60.285,31.215 60.1,31.4 59.7,31.4 59.35,31.75 59.35,32.35 59.6,32.6 v1(59.9,32.6)
  L10 w0.114: v1(38.4,52.1) 38.555,52.1 38.855,52.4 39.2,52.4 40,53.2 40,53.9 40.8,54.7 40.8,55.7 41.6,56.5 41.6,57.6 41.82,57.82 41.82,60.78 41.6,61 41.6,62.1 42,62.5 42,62.8 41.7,63.1 41.1,63.1 40.9,63.3 40.9,63.7 41.1,63.9 41.5,63.9 41.7,64.1 41.7,64.5 41.5,64.7 40.8,64.7 40.6,64.9 40.6,65.3 40.8,65.5 41.1,65.5 42.2,66.6 42.2,67.4 43.1,68.3 43.1,68.99 43.3,69.19 43.3,72 43.5,72.2 43.9,72.2 44.1,72 44.1,71.4 44.3,71.2 44.8,71.2 45,71.4 45,71.9 45.2,72.1 45.6,72.1 45.8,71.9 45.8,71.4 46,71.2 46.4,71.2 46.6,71.4 46.6,72.6 46.9,72.9 47.7,72.9 48.1,72.5 48.755,72.5 49.5,73.245 49.5,73.6 49.8,73.9 50.5,73.9 51.215,74.615 51.981,74.615 52.196,74.4 52.656,74.4 53.141,74.885 55.915,74.885 v1(56.1,74.7)
DRAM_A14: R108.1 U1.AA12 U2.T7 U3.T7 U4.T7 U5.T7 | length 110.6
  L1 w0.114: U1.AA12@36.4,47.7 v1(36.8,47.3) ; U2.T7@56.5,32.1 56.9,32.5 v1(57.2,32.5) ; U3.T7@56.5,44.1 56.9,44.5 v1(57.2,44.5) ; U4.T7@56.5,56.1 56.9,56.5 v1(57.2,56.5) ; U5.T7@56.5,68.1 56.9,68.5 v1(57.2,68.5) ; R108.1@60.165,34.5 60.5,34.165 60.5,33.7 v1(60.9,33.3)
  L3 w0.12: v1(57.5,73.9) 57.5,73.096 58.1,72.496 58.1,70.7 57.75,70.35 57.75,69.2 57.2,68.65 v1(57.2,68.5) 58.1,67.6 58.1,67.2 57.825,66.925 57.825,66.575 58.1,66.3 58.1,65.6 57.7,65.2 57.7,63.3 58.1,62.9 58.1,57.4 v1(57.2,56.5) 58.1,55.6 58.1,55.2 57.825,54.925 57.825,54.575 58.1,54.3 58.1,53.6 57.7,53.2 57.7,51.3 58.1,50.9 58.1,45.4 v1(57.2,44.5) 58.1,43.6 58.1,43.2 57.825,42.925 57.825,42.575 58.1,42.3 58.1,41.6 57.7,41.2 57.7,39.3 58.1,38.9 58.1,33.4 v1(57.2,32.5) 57.2,32.332 57.615,31.917 57.615,30.915 57.815,30.715 58.215,30.715 58.415,30.915 58.415,32.015 59.1,32.7 59.1,34.125 59.325,34.35 59.675,34.35 59.9,34.125 59.9,33.2 60.4,32.7 60.7,32.7 60.9,32.9 v1(60.9,33.3)
  L10 w0.114: v1(36.8,47.3) 36.8,47.044 37.215,46.629 37.215,46.341 37.471,46.085 37.759,46.085 39.729,44.115 40.585,44.115 40.9,43.8 46.8,43.8 47.915,44.915 52.259,44.915 53.7,46.356 53.7,46.7 54.215,47.215 54.215,47.815 54.315,47.915 54.315,49.559 54.515,49.759 54.515,51.115 54.915,51.515 54.915,52.815 55.3,53.2 55.3,54.3 54.9,54.7 54.9,58.244 55.015,58.359 55.015,59.759 55.1,59.844 55.1,61.8 55.3,62 55.3,63.3 55.7,63.7 55.7,66.656 56.515,67.471 56.515,69.459 56.771,69.715 57.059,69.715 57.285,69.941 57.285,73.685 v1(57.5,73.9)
DRAM_A15: R111.1 U1.Y12 U2.M7 U3.M7 U4.M7 U5.M7 | length 109.6
  L1 w0.114: U1.Y12@35.6,47.7 36,47.3 v1(36,46.5) ; v1(53.3,31.5) U2.M7@53.3,32.1 ; v1(53.3,43.5) U3.M7@53.3,44.1 ; v1(53.3,55.5) U4.M7@53.3,56.1 ; v1(53.3,67.5) U5.M7@53.3,68.1 ; v1(57.6,25.8) 57.765,25.635 R111.1@58.1,25.635
  L8 w0.12: v1(52,72.6) 52.256,72.6 53,71.856 53,71.415 52.8,71.215 52.8,70.865 53.32,70.345 53.32,69.92 52.9,69.5 52.9,68.2 53.3,67.8 v1(53.3,67.5) 53.3,66.4 53.7,66 53.7,63.744 52.9,62.944 52.9,62 53.215,61.685 53.215,61.185 53.5,60.9 53.5,60.2 53.115,59.815 53.115,58.429 53.285,58.259 53.285,57.941 52.9,57.556 52.9,56.253 53.3,55.853 v1(53.3,55.5) 53.3,54.4 53.7,54 53.7,51.744 52.9,50.944 52.9,50 53.215,49.685 53.215,49.185 53.5,48.9 53.5,48.2 53.115,47.815 53.115,46.429 53.285,46.259 53.285,45.941 52.9,45.556 52.9,44.253 53.3,43.853 v1(53.3,43.5) 53.3,42.4 53.7,42 53.7,39.744 52.9,38.944 52.9,38 53.215,37.685 53.215,37.185 53.5,36.9 53.5,36.2 53.115,35.815 53.115,34.429 53.285,34.259 53.285,33.941 52.9,33.556 52.9,32.253 53.3,31.853 v1(53.3,31.5) 53.3,30.1 53.7,29.7 53.7,26.444 54.585,25.559 54.585,25.271 54.841,25.015 55.315,25.015 55.7,25.4 56.3,25.4 56.5,25.2 57.256,25.2 57.6,25.544 v1(57.6,25.8)
  L10 w0.114: v1(36,46.5) 36.415,46.915 36.415,47.459 36.671,47.715 36.959,47.715 37.185,47.941 37.185,48.285 37.415,48.515 37.819,48.515 38.115,48.811 38.689,48.811 38.958,48.542 39.342,48.542 39.611,48.811 42.289,48.811 42.7,48.4 45.5,48.4 45.9,48.8 46.644,48.8 46.859,49.015 48.995,49.015 49.256,49.276 49.256,49.544 49,49.8 47.8,49.8 47.6,50 47.6,50.3 47.8,50.5 48.27,50.5 48.485,50.715 48.485,51.059 48.229,51.315 47.94,51.315 47.715,51.541 47.715,51.859 47.97,52.115 48.259,52.115 48.444,52.3 48.444,52.644 48.685,52.885 49.029,52.885 49.9,53.756 49.9,54.3 50.15,54.55 50.15,54.894 49.6,55.444 49.6,55.8 50.085,56.285 50.085,56.659 49.844,56.9 49.5,56.9 49.3,57.1 49.3,57.5 49.5,57.7 50,57.7 50.2,57.9 50.2,58.284 49.992,58.492 49.808,58.492 49.6,58.7 49.6,59 50.3,59.7 50.556,59.7 50.8,59.944 50.8,60.4 49.7,61.5 49.7,61.9 49.9,62.1 50.3,62.1 50.5,62.3 50.5,65.644 51.5,66.644 51.5,67 51.285,67.215 51.041,67.215 50.815,67.441 50.815,67.759 51.041,67.985 51.329,67.985 51.974,68.63 51.974,69.174 52.1,69.3 52.1,70.3 52.5,70.7 52.5,71 52.1,71.4 52.1,71.7 52.4,72 52.4,72.2 v1(52,72.6)
DRAM_CAS_B: R39.1 U1.AE16 U2.K3 U3.K3 U4.K3 U5.K3 | length 109.5
  L1 w0.114: U1.AE16@39.6,50.9 39.8,51.1 v1(40.4,51.1) ; U2.K3@51.7,28.9 v1(52.1,28.5) ; U3.K3@51.7,40.9 v1(52.1,40.5) ; U4.K3@51.7,52.9 v1(52.1,52.5) ; U5.K3@51.7,64.9 v1(52.1,64.5) ; R39.1@57.2,23.035 57.2,22.4 v1(57.4,22.2)
  L3 w0.12: v1(50.2,73.4) 49.8,73 48.7,73 48.5,72.8 48.5,72.4 48.7,72.2 50.3,72.2 50.5,72 50.5,71.8 49.8,71.1 49.8,70.7 50,70.5 50.4,70.5 51.1,71.2 51.5,71.2 51.7,71 51.7,65.1 52.1,64.7 v1(52.1,64.5) 52.1,64.314 51.7,63.914 51.7,63.5 51.225,63.025 51.225,62.631 51.6,62.256 51.6,61.9 51.3,61.6 51.3,61.2 50.9,60.8 50.9,60.3 51.5,59.7 51.5,59.14 51.7,58.94 51.7,53.156 52.1,52.756 v1(52.1,52.5) 52.1,52.314 51.7,51.914 51.7,51.5 51.225,51.025 51.225,50.631 51.6,50.256 51.6,49.9 51.3,49.6 51.3,49.2 50.9,48.8 50.9,48.3 51.5,47.7 51.5,47.14 51.7,46.94 51.7,41.156 52.1,40.756 v1(52.1,40.5) 52.1,40.314 51.7,39.914 51.7,39.5 51.225,39.025 51.225,38.631 51.6,38.256 51.6,37.9 51.3,37.6 51.3,37.2 50.9,36.8 50.9,36.3 51.5,35.7 51.5,35.14 51.7,34.94 51.7,29.156 52.1,28.756 v1(52.1,28.5) 52.1,28.244 51.685,27.829 51.685,26.715 52.2,26.2 52.2,25.256 54.256,23.2 56.5,23.2 57.4,22.3 v1(57.4,22.2)
  L10 w0.114: v1(40.4,51.1) 40.4,51.4 41.015,52.015 42.679,52.015 43.6,52.936 43.6,55 43.915,55.315 44.985,55.315 45.185,55.515 45.185,55.915 44.985,56.115 44,56.115 43.8,56.315 43.8,56.815 44.1,57.115 44.1,57.9 44.685,58.485 45.87,58.485 46.1,58.715 46.1,59.015 45.9,59.215 45.141,59.215 44.915,59.441 44.915,59.759 45.156,60 46.4,60 46.7,60.3 46.7,60.7 46.385,61.015 45.331,61.015 45.106,61.24 45.106,61.6 45.306,61.8 46.1,61.8 46.9,62.6 46.9,63.044 46.644,63.3 45.9,63.3 45.7,63.5 45.7,63.9 45.9,64.1 46.7,64.1 46.9,64.3 46.9,64.7 46.7,64.9 45.555,64.9 45.315,65.141 45.315,65.429 44.932,65.813 44.932,67.488 45.559,68.115 46.709,68.115 46.9,68.306 46.9,68.644 47.156,68.9 47.444,68.9 47.685,69.141 47.685,69.885 48,70.2 48.4,70.2 49.015,70.815 49.015,71.545 49.8,72.33 49.8,73 v1(50.2,73.4)
DRAM_CLK0_N: C327.2 R112.2 U1.AE15 U2.K7 U3.K7 U4.K7 U5.K7 | length 110.5
  L1 w0.1: U1.AE15@39.6,50.1 39.853,50.1 40.098,50.345 40.67,50.345 40.78,50.235 41.22,50.235 41.39,50.405 41.846,50.405 43.3,51.859 43.3,52.95 43.55,53.2 44.209,53.2 44.66,53.651 44.66,54.549 44.049,55.16 43.34,55.16 42.7,55.8 42.7,56.1 43.1,56.5 43.1,56.8 42.7,57.2 42.7,57.456 43.4,58.156 43.4,58.867 42.96,59.307 42.96,59.949 41.5,61.409 41.5,65.3 42.04,65.84 43.795,65.84 44.305,66.351 44.305,67.204 43.742,67.767 41.942,67.767 40.17,69.54 40.17,69.93 40.624,70.385 41.115,70.385 42.16,69.34 43.049,69.34 43.76,70.051 43.76,70.949 42.3,72.409 42.3,73.6 42.7,74 44.3,74 45.46,72.84 47.749,72.84 48.16,73.251 48.16,74.46 v1(48.3,74.6) ; v1(50.05,22.55) 50.1,22.6 R112.2@50.1,23.035 ; v1(51.2,31.6) U2.K7@51.7,32.1 ; v1(51.2,43.6) U3.K7@51.7,44.1 ; v1(51.2,55.6) U4.K7@51.7,56.1 ; v1(51.2,67.6) U5.K7@51.7,68.1
  L8 w0.11: v1(48.3,74.6) 48.16,74.46 48.16,73.19 49.23,72.12 49.833,72.12 50.5,71.453 50.5,68.753 50.96,68.293 50.96,67.84 v1(51.2,67.6) 50.96,67.36 50.96,66.46 50.52,66.02 50.52,62.62 49.85,61.95 49.85,61.303 50.32,60.833 50.32,59.82 50.1,59.6 50.1,58.853 50.52,58.433 50.52,56.673 50.96,56.233 50.96,55.84 v1(51.2,55.6) 50.96,55.36 50.96,54.46 50.52,54.02 50.52,50.62 49.85,49.95 49.85,49.303 50.32,48.833 50.32,47.82 50.1,47.6 50.1,46.853 50.52,46.433 50.52,44.673 50.96,44.233 50.96,43.84 v1(51.2,43.6) 50.96,43.36 50.96,42.46 50.52,42.02 50.52,38.62 49.85,37.95 49.85,37.303 50.32,36.833 50.32,35.82 50.1,35.6 50.1,33.953 50.52,33.533 50.52,32.673 50.96,32.233 50.96,31.84 v1(51.2,31.6) 50.96,31.36 50.96,30.96 50,30 50,29.6 50.65,28.95 50.65,26.797 50,26.147 50,25.3 50.62,24.68 50.62,24.02 49.91,23.31 49.91,22.69 v1(50.05,22.55)
DRAM_CLK0_P: C327.1 R253.2 U1.AD15 U2.J7 U3.J7 U4.J7 U5.J7 | length 110.5
  L1 w0.1: U1.AD15@38.8,50.1 39.07,50.1 39.45,50.48 39.78,50.48 39.965,50.665 40.64,50.665 40.74,50.765 C327.1@41,50.765 41.235,50.765 41.275,50.725 41.714,50.725 42.98,51.991 42.98,53.083 43.417,53.52 44.077,53.52 44.34,53.783 44.34,54.417 43.917,54.84 43.207,54.84 42.38,55.667 42.38,57.588 43.08,58.288 43.08,58.735 42.64,59.175 42.64,59.817 41.18,61.277 41.18,65.433 41.907,66.16 43.662,66.16 43.985,66.483 43.985,67.071 43.609,67.447 41.809,67.447 39.85,69.407 39.85,70.063 40.492,70.705 41.248,70.705 42.293,69.66 42.917,69.66 43.44,70.183 43.44,70.817 41.98,72.277 41.98,73.733 42.567,74.32 44.433,74.32 45.593,73.16 47.617,73.16 47.84,73.383 47.84,74.46 v1(47.7,74.6) ; R253.2@49.4,23.035 49.4,22.6 v1(49.45,22.55) ; v1(50.4,31.6) U2.J7@50.9,32.1 ; v1(50.4,43.6) U3.J7@50.9,44.1 ; v1(50.4,55.6) U4.J7@50.9,56.1 ; v1(50.4,67.6) U5.J7@50.9,68.1
  L8 w0.11: v1(47.7,74.6) 47.84,74.46 47.84,73.057 49.097,71.8 49.7,71.8 50.18,71.32 50.18,68.62 50.64,68.16 50.64,67.84 v1(50.4,67.6) 50.64,67.36 50.64,66.593 50.2,66.153 50.2,62.753 49.53,62.083 49.53,61.17 50,60.7 50,59.953 49.78,59.733 49.78,58.72 50.2,58.3 50.2,56.54 50.64,56.1 50.64,55.84 v1(50.4,55.6) 50.64,55.36 50.64,54.593 50.2,54.153 50.2,50.753 49.53,50.083 49.53,49.17 50,48.7 50,47.953 49.78,47.733 49.78,46.72 50.2,46.3 50.2,44.54 50.64,44.1 50.64,43.84 v1(50.4,43.6) 50.64,43.36 50.64,42.593 50.2,42.153 50.2,38.753 49.53,38.083 49.53,37.17 50,36.7 50,35.953 49.78,35.733 49.78,33.82 50.2,33.4 50.2,32.54 50.64,32.1 50.64,31.84 v1(50.4,31.6) 50.64,31.36 50.64,31.093 49.68,30.133 49.68,29.467 50.33,28.817 50.33,26.93 49.68,26.28 49.68,25.167 50.3,24.547 50.3,24.153 49.59,23.443 49.59,22.69 v1(49.45,22.55)
DRAM_CLK0_T_CAP: C322.1 R112.1 R253.1 | length 1.6
  L1 w0.3: R253.1@49.4,23.565 R112.1@50.1,23.565 50.465,23.93 C322.1@50.465,24.3
DRAM_CLK1_N: C328.2 R113.2 U1.AE14 | length 3.2
  L1 w0.1: U1.AE14@39.6,49.3 39.847,49.3 40.167,49.62 41.48,49.62 41.565,49.535 C328.2@41.565,49.3 41.565,49.265 41.355,49.055 41.355,48.865 R113.2@41.555,48.665 ; R113.2@41.565,48.655 R113.2@41.555,48.665 ; R113.2@41.6,48.665 R113.2@41.555,48.665
DRAM_CLK1_P: C328.1 R256.2 U1.AD14 | length 3.2
  L1 w0.1: U1.AD14@38.8,49.3 39.1,49.3 39.5,48.9 39.9,48.9 40.3,49.3 C328.1@41.035,49.3 41.035,48.7 R256.2@41,48.665
DRAM_CLK1_T_CAP: C323.1 R113.1 R256.1 | length 2
  L1 w0.3: R256.1@41,48.135 41.561,48.135 R113.1@41.6,48.096 ; R113.1@41.6,48.135 R113.1@41.6,48.096 ; C323.1@42.1,46.965 42.1,47.472 41.6,47.972 R113.1@41.6,48.096
DRAM_CS0_B: R66.1 U1.Y16 U2.L2 U3.L2 U4.L2 U5.L2 | length 109.5
  L1 w0.114: U1.Y16@35.6,50.9 36,51.3 v1(36,52.1) ; U2.L2@52.5,28.1 v1(52.9,27.7) ; U3.L2@52.5,40.1 v1(52.9,39.7) ; U4.L2@52.5,52.1 v1(52.9,51.7) ; U5.L2@52.5,64.1 v1(52.9,63.7) ; v1(59.2,25) 59.365,25.165 R66.1@59.365,25.5
  L8 w0.12: v1(50.6,75) 51,74.6 51,73.555 51.6,72.955 51.6,72.456 52.2,71.856 52.2,71.147 52.5,70.847 52.5,68.153 52.9,67.753 52.9,65.3 53.3,64.9 53.3,64.356 52.9,63.956 v1(52.9,63.7) 52.9,63.418 52.58,63.098 52.58,62.08 52.4,61.9 52.4,61.2 52.7,60.9 52.7,60.4 52.3,60 52.3,59.4 52.725,58.975 52.725,58.525 52.44,58.24 52.44,56.16 52.9,55.7 52.9,53.1 53.3,52.7 53.3,52.1 v1(52.9,51.7) 52.9,51.418 52.58,51.098 52.58,50.08 52.4,49.9 52.4,49.2 52.7,48.9 52.7,48.4 52.3,48 52.3,47.4 52.725,46.975 52.725,46.525 52.44,46.24 52.44,44.16 52.9,43.7 52.9,41.1 53.3,40.7 53.3,40.1 v1(52.9,39.7) 52.9,39.418 52.58,39.098 52.58,38.08 52.4,37.9 52.4,37.2 52.7,36.9 52.7,36.4 52.3,36 52.3,35.4 52.725,34.975 52.725,34.525 52.44,34.24 52.44,32.16 52.9,31.7 52.9,29.1 53.3,28.7 53.3,28.1 v1(52.9,27.7) 52.9,26.5 53.8,25.6 53.8,25.256 54.3,24.756 54.3,23.7 54.5,23.5 54.9,23.5 55.1,23.7 55.1,24.2 55.5,24.6 58.8,24.6 v1(59.2,25)
  L10 w0.114: v1(36,52.1) 36,52.3 35.615,52.685 35.615,53.115 35.785,53.285 36.129,53.285 36.415,53.571 36.415,53.859 36.671,54.115 36.959,54.115 37.215,54.371 37.215,56.259 37.441,56.485 37.785,56.485 38,56.7 38,57.1 38.4,57.5 38.4,57.915 38,58.315 38,59.485 37.233,60.252 37.233,61.833 38.067,62.667 38.067,64.167 38.3,64.4 38.3,65.885 38.9,66.485 38.9,67 38.7,67.2 38.1,67.2 37.9,67.4 37.9,67.8 38.1,68 38.535,68 38.8,68.265 38.8,68.6 38.6,68.8 37.705,68.8 37.505,69 37.505,69.4 37.705,69.6 38.7,69.6 38.9,69.8 38.9,70.2 38.7,70.4 38.4,70.4 38.2,70.6 38.2,71 38.4,71.2 39.2,71.2 42.3,74.3 42.3,75.6 42.8,76.1 43.465,76.1 43.765,75.8 44.2,75.8 44.5,76.1 45.1,76.1 45.4,75.8 45.8,75.8 46.1,76.1 46.7,76.1 47.415,75.385 50.215,75.385 v1(50.6,75)
DRAM_D0: U1.AD2 U2.E3 | length 19.1
  L1 w0.114: U1.AD2@38.8,39.7 39.2,39.3 v1(39.2,38.5) ; v1(47.3,28.5) U2.E3@47.7,28.9
  L8 w0.12: v1(39.2,38.5) 39.6,38.9 40.2,38.9 40.4,38.7 40.4,38.1 40.2,37.9 39.85,37.9 39.6,37.65 39.6,37 41.2,35.4 41.2,34.404 42.6,33.004 42.6,30.5 42.9,30.2 43.2,30.2 43.4,30 43.4,29.7 43.7,29.4 44.2,29.4 44.7,28.9 45.96,28.9 46.36,28.5 v1(47.3,28.5)
DRAM_D1: U1.AE2 U2.H3 | length 19
  L1 w0.114: U1.AE2@39.6,39.7 v1(40,39.3) ; v1(47.3,29.3) 47.7,29.7 49.3,29.7 U2.H3@50.1,28.9
  L8 w0.12: v1(40,39.3) 40.3,39.3 40.9,38.7 40.9,37.7 40.7,37.5 40.7,36.4 41.6,35.5 41.6,34.456 43,33.056 43,31.05 44.365,29.685 45.571,29.685 46.341,28.915 46.915,28.915 v1(47.3,29.3)
DRAM_D2: U1.AC4 U2.H7 | length 19
  L1 w0.114: U1.AC4@38,41.3 v1(38.4,40.9) ; v1(49.6,31.6) U2.H7@50.1,32.1
  L8 w0.12: v1(38.4,40.9) 38.555,40.9 38.955,40.5 40.4,40.5 41.1,39.8 41.8,39.8 43.015,38.585 43.471,38.585 43.821,38.235 44.865,38.235 45.315,37.785 45.315,37.241 45.541,37.015 46.735,37.015 47,36.75 47,36.3 46.72,36.02 46.72,35.32 46.915,35.125 46.915,33.141 47.141,32.915 47.53,32.915 47.945,32.5 48.355,32.5 48.755,32.1 49.1,32.1 v1(49.6,31.6)
DRAM_D3: U1.AA5 U2.F8 | length 19
  L1 w0.114: U1.AA5@36.4,42.1 v1(36.8,41.7) ; v1(48.1,33.3) U2.F8@48.5,32.9
  L8 w0.12: v1(36.8,41.7) 37.2,41.3 40.156,41.3 40.541,41.685 41.371,41.685 43.056,40 43.456,40 43.756,39.7 44.355,39.7 44.77,39.285 46.915,39.285 47.815,38.385 47.815,35.985 47.915,35.885 47.915,35 48.1,34.815 v1(48.1,33.3)
DRAM_D4: U1.AC1 U2.F2 | length 19
  L1 w0.114: U1.AC1@38,38.9 38,38.1 v1(38.4,37.7) ; v1(48.1,27.7) U2.F2@48.5,28.1
  L8 w0.12: v1(38.4,37.7) 38.745,37.355 38.745,36.7 40.4,35.045 40.4,34.1 41.115,33.385 41.115,30.285 43.315,28.085 45.059,28.085 45.285,27.859 45.285,27.571 45.541,27.315 47.715,27.315 v1(48.1,27.7)
DRAM_D5: U1.AD1 U2.G2 | length 19
  L1 w0.114: U1.AD1@38.8,38.9 38.8,38.1 v1(39.2,37.7) ; v1(48.9,27.7) U2.G2@49.3,28.1
  L8 w0.12: v1(39.2,37.7) 39.2,36.8 40.8,35.2 40.8,34.3 42.1,33 42.1,32.2 41.9,32 41.9,31.5 42.1,31.3 42.1,29.856 43.306,28.65 43.65,28.65 43.9,28.9 44.244,28.9 44.644,28.5 45.1,28.5 45.5,28.1 48.244,28.1 48.644,27.7 v1(48.9,27.7)
DRAM_D6: U1.AB4 U2.F7 | length 19
  L1 w0.114: U1.AB4@37.2,41.3 v1(37.6,40.9) ; U2.F7@48.5,32.1 v1(48.9,31.7)
  L8 w0.12: v1(37.6,40.9) 37.985,40.515 38.529,40.515 38.944,40.1 40.404,40.1 40.984,39.52 41.336,39.52 43.156,37.7 43.556,37.7 43.756,37.9 44.644,37.9 45.035,37.509 45.035,37.061 45.396,36.7 45.9,36.7 46.2,36.4 46.2,36.1 45.9,35.8 45.9,35.1 46.1,34.9 46.1,33.156 46.371,32.885 46.659,32.885 46.885,32.659 46.885,32.371 47.141,32.115 48.345,32.115 48.76,31.7 v1(48.9,31.7)
DRAM_D7: U1.AE4 U2.H8 | length 19
  L1 w0.114: U1.AE4@39.6,41.3 v1(40,40.9) ; v1(49.7,32.5) U2.H8@50.1,32.9
  L8 w0.12: v1(40,40.9) 40.6,40.9 40.8,40.7 41.2,40.7 41.4,40.9 41.744,40.9 42.185,40.459 42.185,40.015 43,39.2 44.056,39.2 44.741,38.515 45.385,38.515 45.6,38.3 45.6,38 45.8,37.8 46.2,37.8 46.4,38 46.4,38.3 46.6,38.5 47.1,38.5 47.3,38.3 47.3,37.9 47,37.6 47,37.256 47.5,36.756 47.5,36.3 47.1,35.9 47.1,35.336 47.7,34.736 47.7,33.156 47.941,32.915 49.285,32.915 v1(49.7,32.5)
DRAM_D8: U1.AD5 U2.D7 | length 20.4
  L1 w0.114: U1.AD5@38.8,42.1 v1(39.2,41.7) ; U2.D7@46.9,32.1 v1(47.3,32.5)
  L3 w0.12: v1(39.2,41.7) 39.4,41.7 39.756,41.344 40.2,41.344 40.656,41.8 41.075,41.8 41.308,41.567 41.308,41.092 41.5,40.9 42.1,40.9 42.485,40.515 42.929,40.515 43.8,39.644 43.8,39.404 44.215,38.989 44.215,37.185 44.68,36.72 45.2,36.72 45.4,36.52 45.4,36.22 45.18,36 44.4,36 44.2,35.8 44.2,35.4 44.405,35.195 45.505,35.195 45.685,35.015 45.685,34.615 45.315,34.245 45.315,33.8 45.7,33.415 45.7,33.044 45.315,32.659 45.315,32.341 45.541,32.115 46.915,32.115 v1(47.3,32.5)
DRAM_D9: U1.AE5 U2.C3 | length 20.4
  L1 w0.114: U1.AE5@39.6,42.1 40.4,41.3 v1(40.7,41.3) ; U2.C3@46.1,28.9 v1(46.5,29.3)
  L3 w0.12: v1(40.7,41.3) 40.45,41.05 40.45,40.046 41.015,39.481 41.015,38.4 41.4,38.015 41.4,36.956 41.556,36.8 41.556,35.7 42.4,34.856 42.4,33.856 42.6,33.656 42.6,32.2 42.85,31.95 42.85,31.588 42.6,31.338 42.6,31.055 44.77,28.885 45.859,28.885 46.1,28.644 46.1,28.3 46.3,28.1 46.7,28.1 46.9,28.3 46.9,28.9 v1(46.5,29.3)
DRAM_D10: U1.AA6 U2.B8 | length 20.4
  L1 w0.114: v1(36,43.3) U1.AA6@36.4,42.9 ; U2.B8@45.3,32.9 45.7,33.3 v1(46.5,33.3)
  L3 w0.12: v1(36,43.3) 36.4,42.9 38.66,42.9 39.06,42.5 41.6,42.5 42.52,41.58 43.02,41.58 43.6,41 44.05,41 44.48,40.57 44.48,39.525 44.69,39.315 45.085,39.315 45.315,39.085 45.315,38.085 45.5,37.9 45.8,37.9 46.115,37.585 46.115,37.185 46.7,36.6 46.7,36 46.9,35.8 46.9,33.7 v1(46.5,33.3)
DRAM_D11: U1.AE7 U2.C8 | length 20.4
  L1 w0.114: U1.AE7@39.6,43.7 40,43.7 v1(40.4,43.3) ; U2.C8@46.1,32.9 v1(46.5,32.5)
  L3 w0.12: v1(40.4,43.3) 40.9,42.8 41.892,42.8 42.792,41.9 43.19,41.9 43.79,41.3 44.2,41.3 44.615,40.885 45.059,40.885 45.3,40.644 45.3,39.496 45.7,39.096 45.7,38.475 46.375,37.8 47.6,37.8 47.8,37.6 47.8,37.2 47.6,37 47.4,37 47.2,36.8 47.2,36.444 47.9,35.744 47.9,35.4 47.7,35.2 47.5,35.2 47.3,35 47.3,34.7 47.5,34.5 48.1,34.5 48.3,34.3 48.3,33.9 48.1,33.7 47.9,33.7 47.7,33.5 47.7,33.156 47.459,32.915 46.915,32.915 v1(46.5,32.5)
DRAM_D12: U1.AB5 U2.C2 | length 20.4
  L1 w0.114: U1.AB5@37.2,42.1 v1(37.6,41.7) ; v1(45.7,27.7) U2.C2@46.1,28.1
  L3 w0.12: v1(37.6,41.7) 37.985,41.315 37.985,40.771 38.271,40.485 38.559,40.485 39.065,39.979 39.065,39.179 39.585,38.659 39.585,37.541 39.4,37.356 39.4,36.668 41.085,34.983 41.085,32.941 40.758,32.613 40.758,30.342 42.35,28.75 42.79,28.75 43.26,28.28 43.776,28.28 43.956,28.1 45.3,28.1 v1(45.7,27.7)
DRAM_D13: U1.AC5 U2.A3 | length 20.4
  L1 w0.114: U1.AC5@38,42.1 v1(38.4,41.7) ; v1(44.1,28.5) U2.A3@44.5,28.9
  L3 w0.12: v1(38.4,41.7) 38.4,41.56 38.785,41.175 38.785,40.715 39.5,40 39.5,39.256 39.871,38.885 40.159,38.885 40.385,38.659 40.385,37.585 40.2,37.4 39.9,37.4 39.7,37.2 39.7,36.8 39.9,36.6 40.6,36.6 40.8,36.4 40.8,35.664 41.6,34.864 41.6,33.06 41.115,32.575 41.115,32.241 41.6,31.756 41.6,31.5 41.115,31.015 41.115,30.685 41.4,30.4 41.7,30.4 41.9,30.6 42.2,30.6 42.4,30.4 42.4,30.1 42.1,29.8 42.1,29.5 42.5,29.1 42.856,29.1 43.396,28.56 44.04,28.56 v1(44.1,28.5)
DRAM_D14: U1.AB6 U2.A2 | length 20.4
  L1 w0.114: v1(36.8,42.5) U1.AB6@37.2,42.9 ; v1(44.1,27.7) U2.A2@44.5,28.1
  L3 w0.12: v1(36.8,42.5) 37.2,42.1 37.2,40.756 37.471,40.485 37.815,40.485 38.015,40.285 38.015,39.941 38.271,39.685 38.559,39.685 38.785,39.459 38.785,36.815 40.7,34.9 40.7,33.715 40.285,33.3 40.285,32.815 40.4,32.7 40.4,30.1 42.1,28.4 42.744,28.4 43.159,27.985 43.459,27.985 43.744,27.7 v1(44.1,27.7)
DRAM_D15: U1.AC7 U2.A7 | length 20.4
  L1 w0.114: U1.AC7@38,43.7 38.4,43.3 v1(38.4,42.5) ; U2.A7@44.5,32.1 44.9,32.5 v1(45.7,32.5)
  L3 w0.12: v1(38.4,42.5) 38.664,42.5 38.964,42.2 39.5,42.2 39.7,42 40.3,42 40.5,42.2 41.4,42.2 41.7,41.9 41.7,41.55 41.965,41.285 42.859,41.285 43.544,40.6 44,40.6 44.2,40.4 44.2,39.4 44.515,39.085 44.515,38.285 45.035,37.765 45.035,37.265 45.3,37 45.8,37 46.3,36.5 46.3,36.2 45.9,35.8 45.9,35.4 46.1,35.2 46.4,35.2 46.6,35 46.6,34.7 46.4,34.5 46,34.5 45.7,34.2 45.7,33.9 46.1,33.5 46.1,32.9 v1(45.7,32.5)